# Altium PCB PCB1.PcbDoc
Units mil, origin at the board's own origin, x right, y up, seen from the top; angles counter-clockwise.
Board outline 2371.12 x 2207.31 mil, 2 copper layers (Top Layer, Bottom Layer); 3 components, 6 nets, 33 pads, 0 vias.
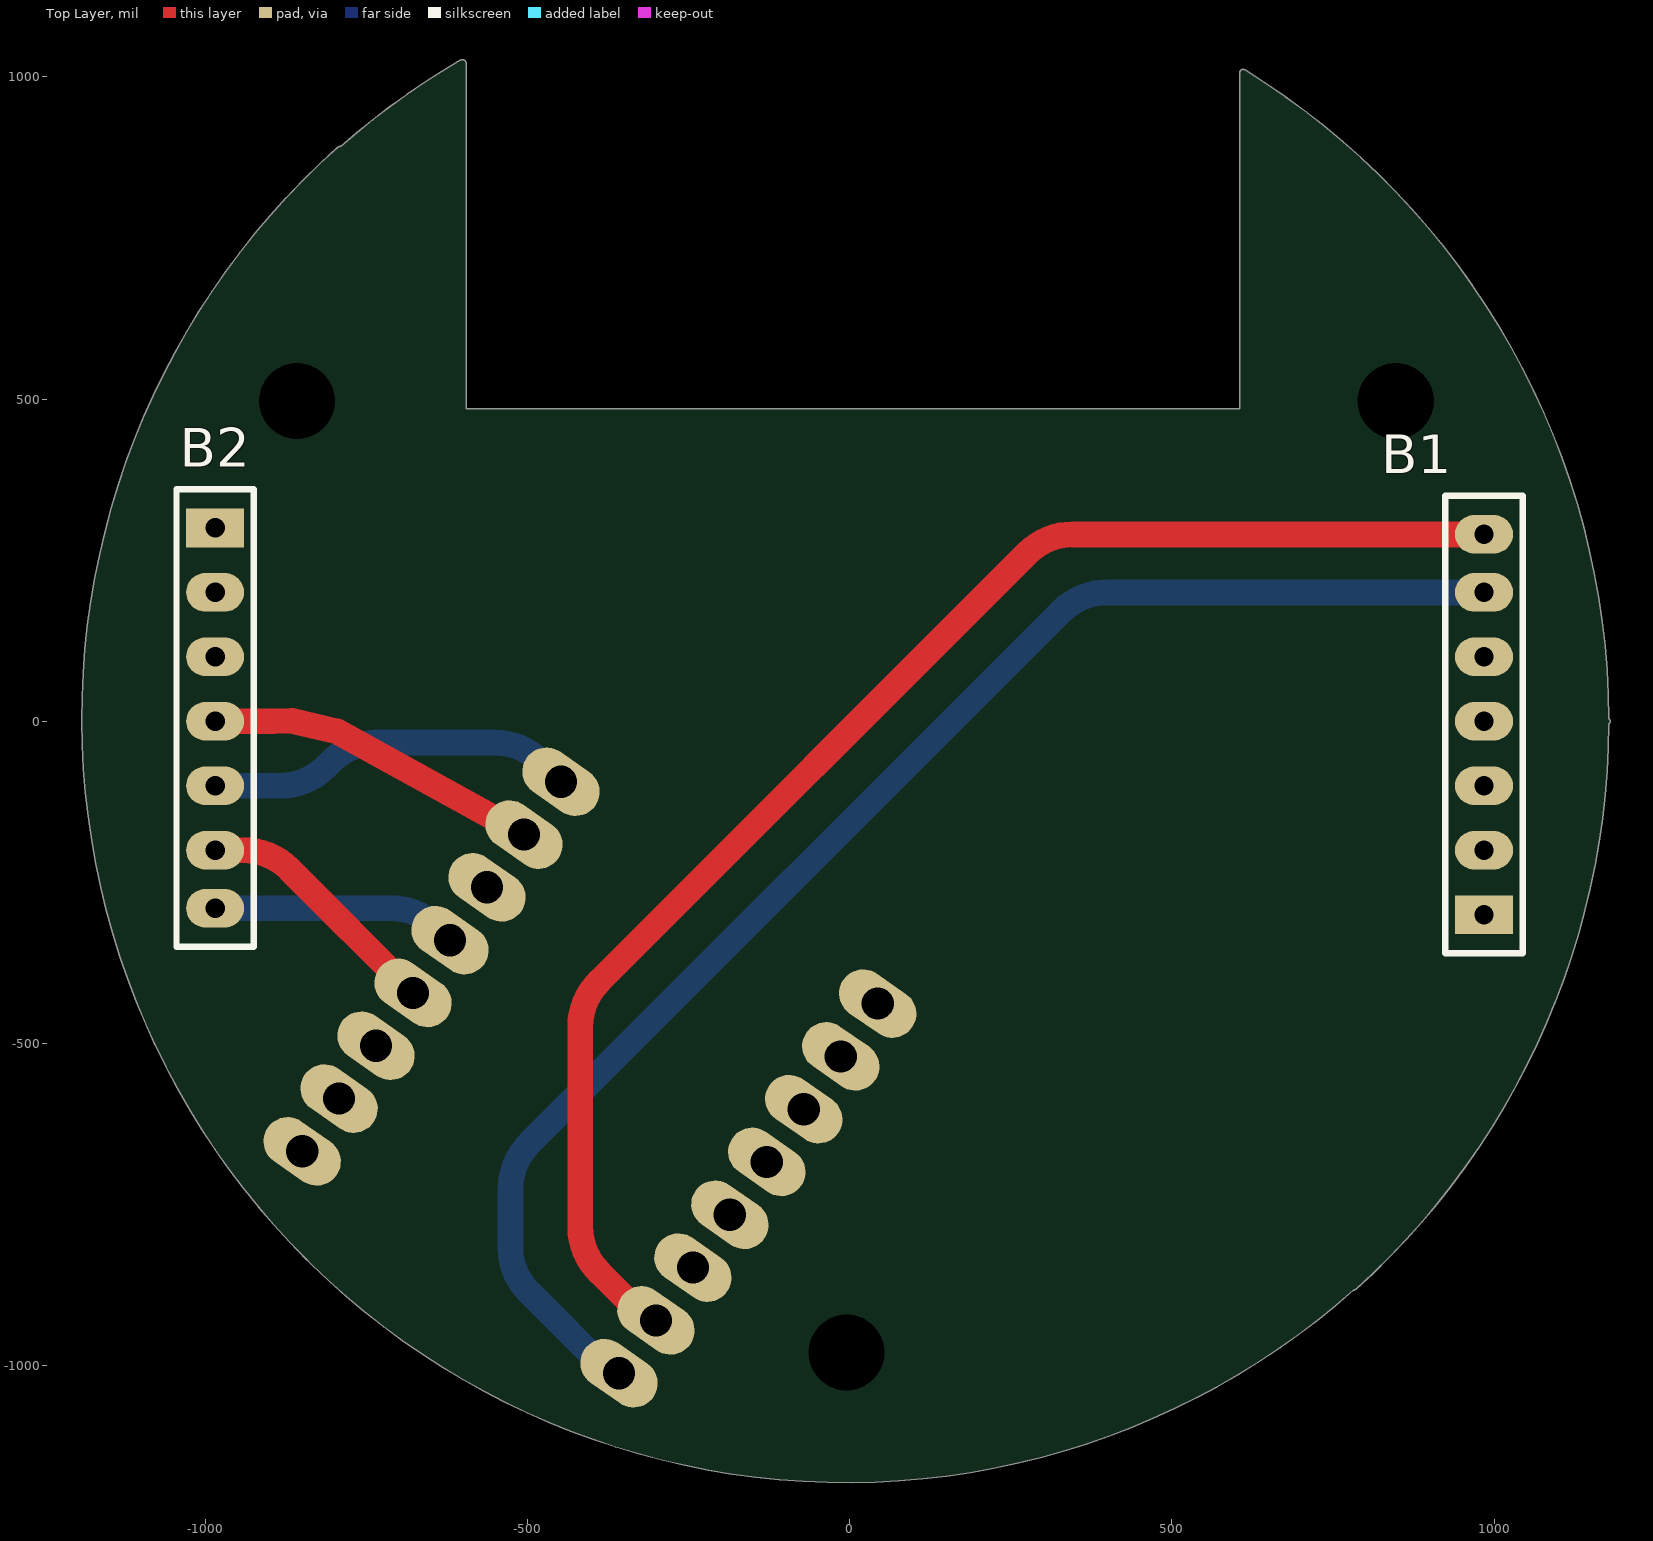
[diagram p0: Top Layer view]
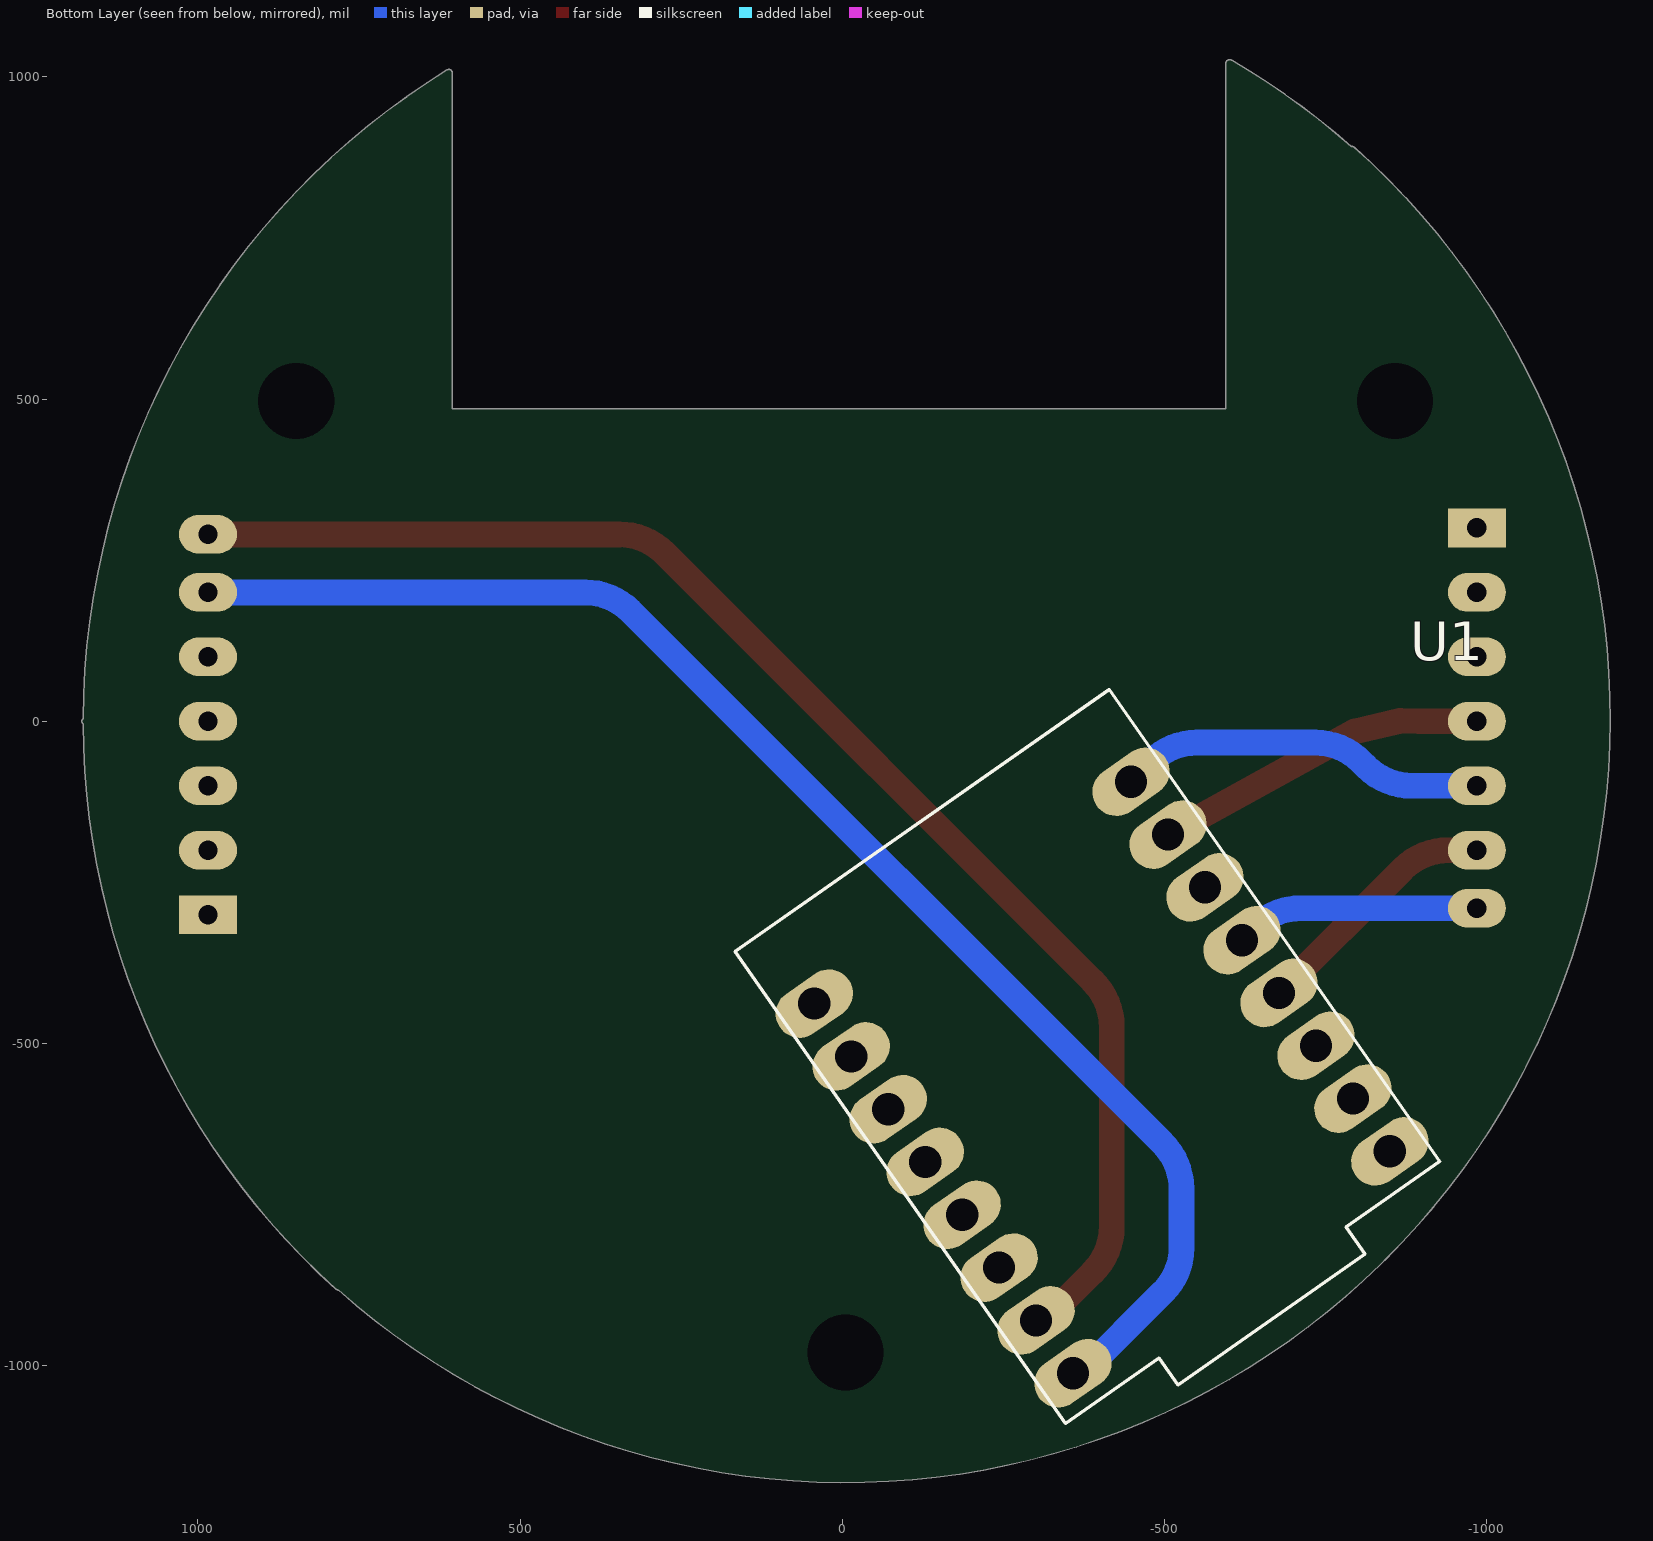
[diagram p1: Bottom Layer view, seen from below]

## Layer stack, top to bottom
Top Solder: solder mask 0.4, Solder Resist, Dk 3.5
Top Layer: signal copper 1.4
Dielectric 1: dielectric 12.6, FR-4, Dk 4.8
Bottom Layer: signal copper 1.4
Bottom Solder: solder mask 0.4, Solder Resist, Dk 3.5

## Board outline
-842.04,-835.38 ccw(c-5,5) -835.32,-842.02 ccw(c-5,5) 782.04,-882.38 ccw(c782.12,-877.37) 785.47,-881.09 ccw(c-8.3,0.27) 1177.81,-4.16 ccw(c1175,0) 1180.01,0 ccw(c1175,0) 1177.81,4.16 ccw(c-8.3,0.27) 613.11,1010.57 ccw(c610.48,1006.3) 605.99,1008.53 ccw(c610,1005.52) 604.99,1005.52 604.99,485.01 -594.98,485.01 -594.98,1021.2 ccw(c-600,1021.2) -600.92,1026.13 ccw(c-601.85,1021.2) -604.38,1025.53 ccw(c-5,2) -789.47,891.65 ccw(c-790.76,886.81) -794.1,890.55 ccw(c-5,5)

## Design rules (kind name [scope] priority, off if disabled: settings)
Clearance [All] p1: gap=25 ignorepadtopadclearanceinfootprint=FALSE
PolygonConnect [All] p1: connectstyle=Relief reliefconductorwidth=10 reliefentries=4 polygonreliefangle="90 Angle" airgapwidth=10
RoutingCorners [OnLayer('Bottom Layer')] p1: cornerstyle=Round minsetback=100 maxsetback=500
RoutingVias [All] p1: holewidth=28 width=50 viastyle="Through Hole" minholewidth=28 minwidth=50 maxholewidth=28 maxwidth=50
SolderMaskExpansion [All] p1: expansion=4 istentingtop=FALSE
Width [All] p1: maxlimit=45 minlimit=35 preferedwidth=40
29 further rules are at their usual default settings.

## Components (designator, comment, footprint, x,y, rotation, side; value= is the part's Value field where it differs from the comment)
B1 "RIGHT BUS" "bus left" 984.25,-300 r90 top
B2 "LEFT BUS" "bus right" -984.25,300 r270 top
U1 "ESP32-C3_SUPERMINI" MODULE_ESP32-C3_SUPERMINI -380,-520 r325 bottom

## Footprints (in the part's own frame and the unit in brackets; to place one, negate y for a bottom-side part, rotate by r counter-clockwise, add the part's x,y. Pads: shape width x height; smd on the part's side, far side on the other; paste and mask are expansions set on the pad)
"bus left" [mil]
  rect 60x90 hole 30: 1(0,0)
  oval 60x90 hole 30: 2(100,0) 3(200,0) 4(300,0) 5(400,0) 6(500,0) 7(590,0)
  silkscreen extent -60,-60 650,60, body extent -50,-50 650,50, height 621
"bus right" [mil]
  rect 60x90 hole 30: 1(0,0)
  oval 60x90 hole 30: 2(100,0) 3(200,0) 4(300,0) 5(400,0) 6(500,0) 7(590,0)
  silkscreen extent -60,-60 650,60, body extent -50,-50 650,50, height 621
MODULE_ESP32-C3_SUPERMINI [mil]
  oval 130x75 hole 50: 0(300,-310.24) 1(300,-210.24) 2(300,-110.24) 3(300,-10.24) 3.3(300,189.76) 4(300,89.77) 5(-300,389.76) 5V(300,389.76) 6(-300,289.76) 7(-300,189.76) 8(-300,89.76) 9(-300,-10.24) 10(-300,-110.24) 20(-300,-210.24) 21(-300,-310.24) G(300,289.76)
  silkscreen extent -354,-447 354,498, body extent -352,-435 357,505, height 152

## Part data
B1: library part "BUS right"
B2: library part "BUS left"
U1: "Super tiny ESP32-C3 board", Package=Package, Check_prices=https://www.snapeda.com/parts/ESP32-C3%20SuperMini/Espressif+Systems/view-part/?ref=eda, MF="Espressif Systems", MP="ESP32-C3 SuperMini", SnapEDA_Link=https://www.snapeda.com/parts/ESP32-C3%20SuperMini/Espressif+Systems/view-part/?ref=snap

## Free pads (board coordinates)
  round 0 hole 118.11: 10(-857.39,497.13) 10(-5,-979.25) 10(847.39,497.13)

## Nets (pads, with @x,y where several pads share a name; then routed paths per layer and width w, separated by ;. In a path a pad name is that pad's centre, name@x,y a point inside that pad or via, vN(x,y) a via of type N, cw(c..) or ccw(c..) an arc to the next point about the centre after c; other vN are vias at no path point)
NetB1_6: B1.6 U1.5V | length 2268.8
  Bottom Layer w40: U1.5V -371.65,-1011.35 -498,-885 cw(c-430.4,-817.4) -526,-817.4 -526,-725.42 cw(c-426,-725.42) -496.71,-654.71 328.71,170.71 cw(c399.42,100) 399.42,200 B1.6
NetB1_7: B1.7 U1.G | length 2249.4
  Top Layer w40: U1.G -313.57,-929.43 -388.71,-854.29 cw(c-318,-783.58) -418,-783.58 -418,-474.42 cw(c-318,-474.42) -388.71,-403.71 275.71,260.71 cw(c346.42,190) 346.42,290 B1.7 B1.7@992,290
NetB2_4: B2.4 U1.20 | length 522.2
  Top Layer w40: B2.4 -894,0 -865.68,0.85 -794.78,-15.79 -535.43,-159 -528,-163.1 U1.20
NetB2_5: B2.5 U1.21 | length 576.5
  Bottom Layer w40: B2.5 -883.42,-100 ccw(c-883.42,0) -812.71,-70.71 -804.29,-62.29 cw(c-733.58,-133) -733.58,-33 -550.02,-33 cw(c-550.02,-133) -479.31,-62.29 U1.21
NetB2_6: B2.6 U1.8 | length 394.4
  Top Layer w40: B2.6 -940.11,-200 cw(c-940.11,-300) -869.4,-229.29 U1.8
NetB2_7: B2.7 U1.9 | length 380.6
  Bottom Layer w40: B2.7 -710.84,-290 cw(c-710.84,-390) -685.51,-293.26 cw(c-710.84,-390) -640.13,-319.29 U1.9
pads on no net: B1.1 B1.2 B1.3 B1.4 B1.5 B2.1 B2.2 B2.3 U1.0 U1.1 U1.2 U1.3 U1.3.3 U1.4 U1.5 U1.6 U1.7 U1.10

## Silkscreen, mask and mechanical layers (free items; w line width, h text height)
Mechanical 1:
  lines w10: -790.76,886.81 ccw(c-5,5) 781.23,-876.38 ; -788.88,885.48 cw(c-5,2) -601.85,1021.2 ; -600,1021.2 -600,480 610,480 610,1005.52 ; 610.48,1006.3 cw(c-8.3,0.27) 782.12,-877.37
Mechanical 13:
  lines w10: -600,780.23 ccw(c0,0) 610,772.43